# Altium PCB FR3068E-C_DEV1.4.PcbDoc (part 1 of 2)
Units mm, origin at the board's own origin, x right, y up, seen from the top; angles counter-clockwise.
Board outline 100 x 100 mm, 2 copper layers (Top Layer, Bottom Layer); 190 components, 181 nets, 704 pads, 626 vias.
Unrouted connection lines stored in the file: 147.
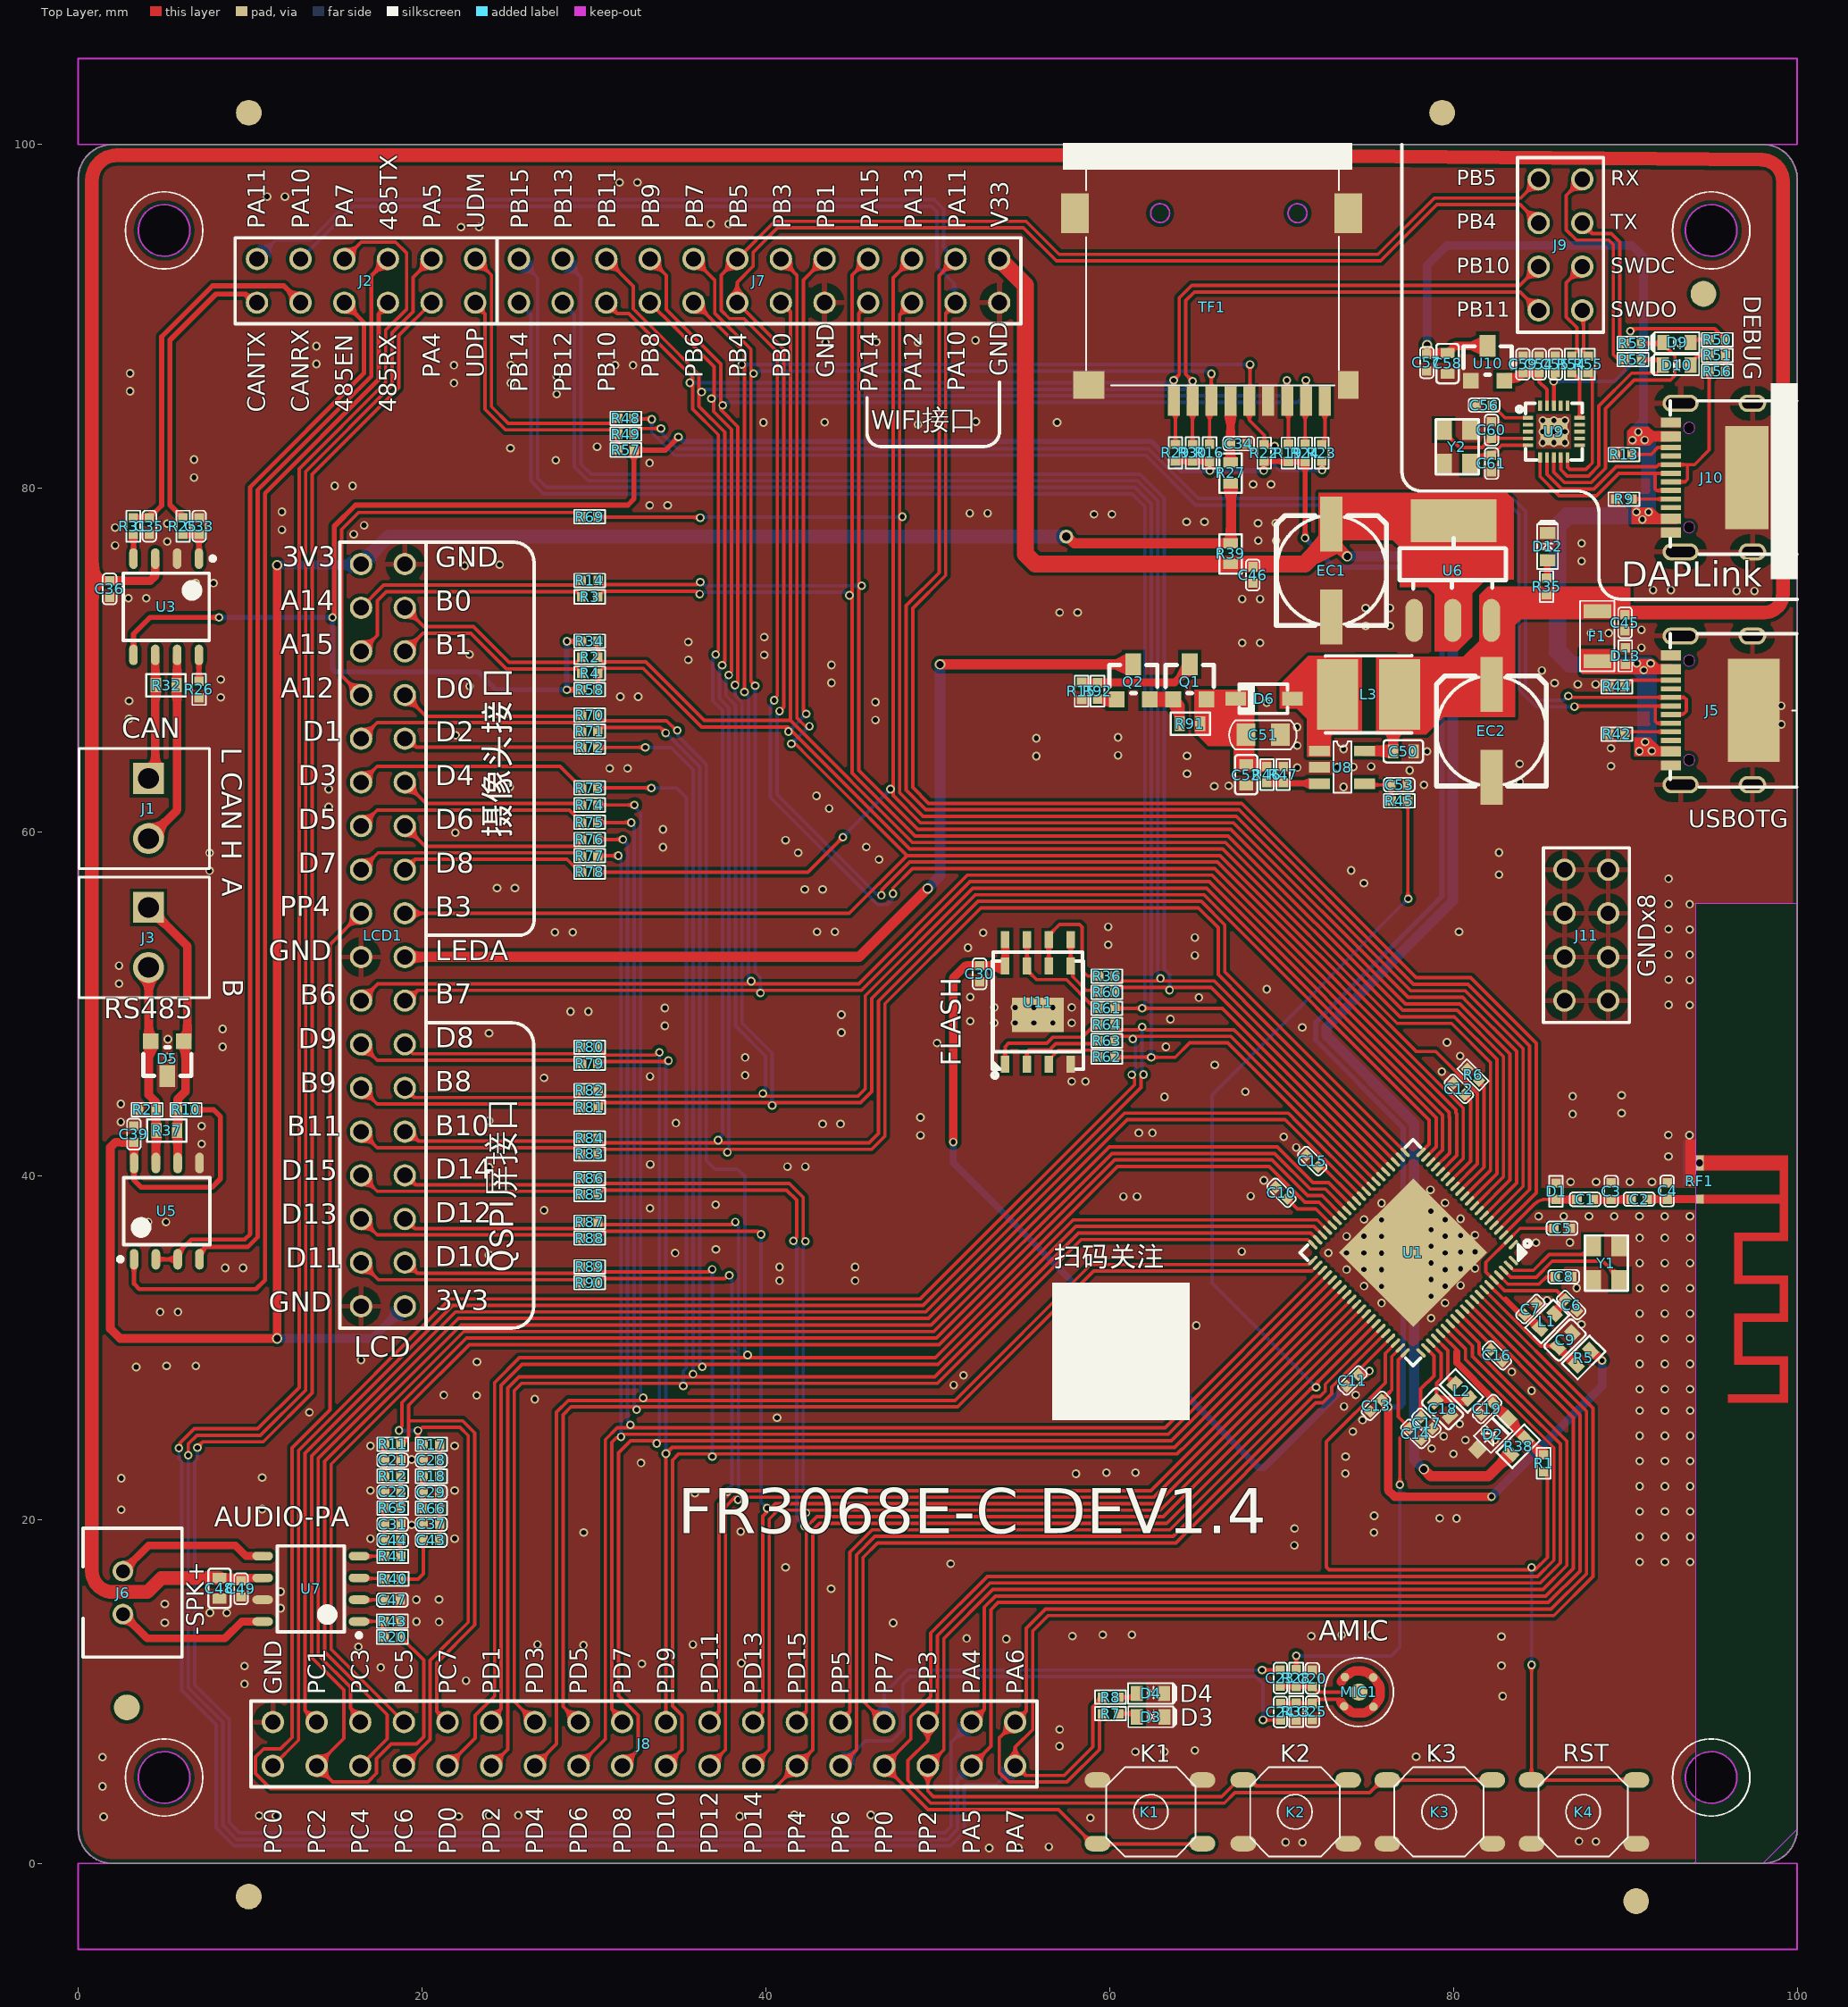
[diagram p0: Top Layer view]
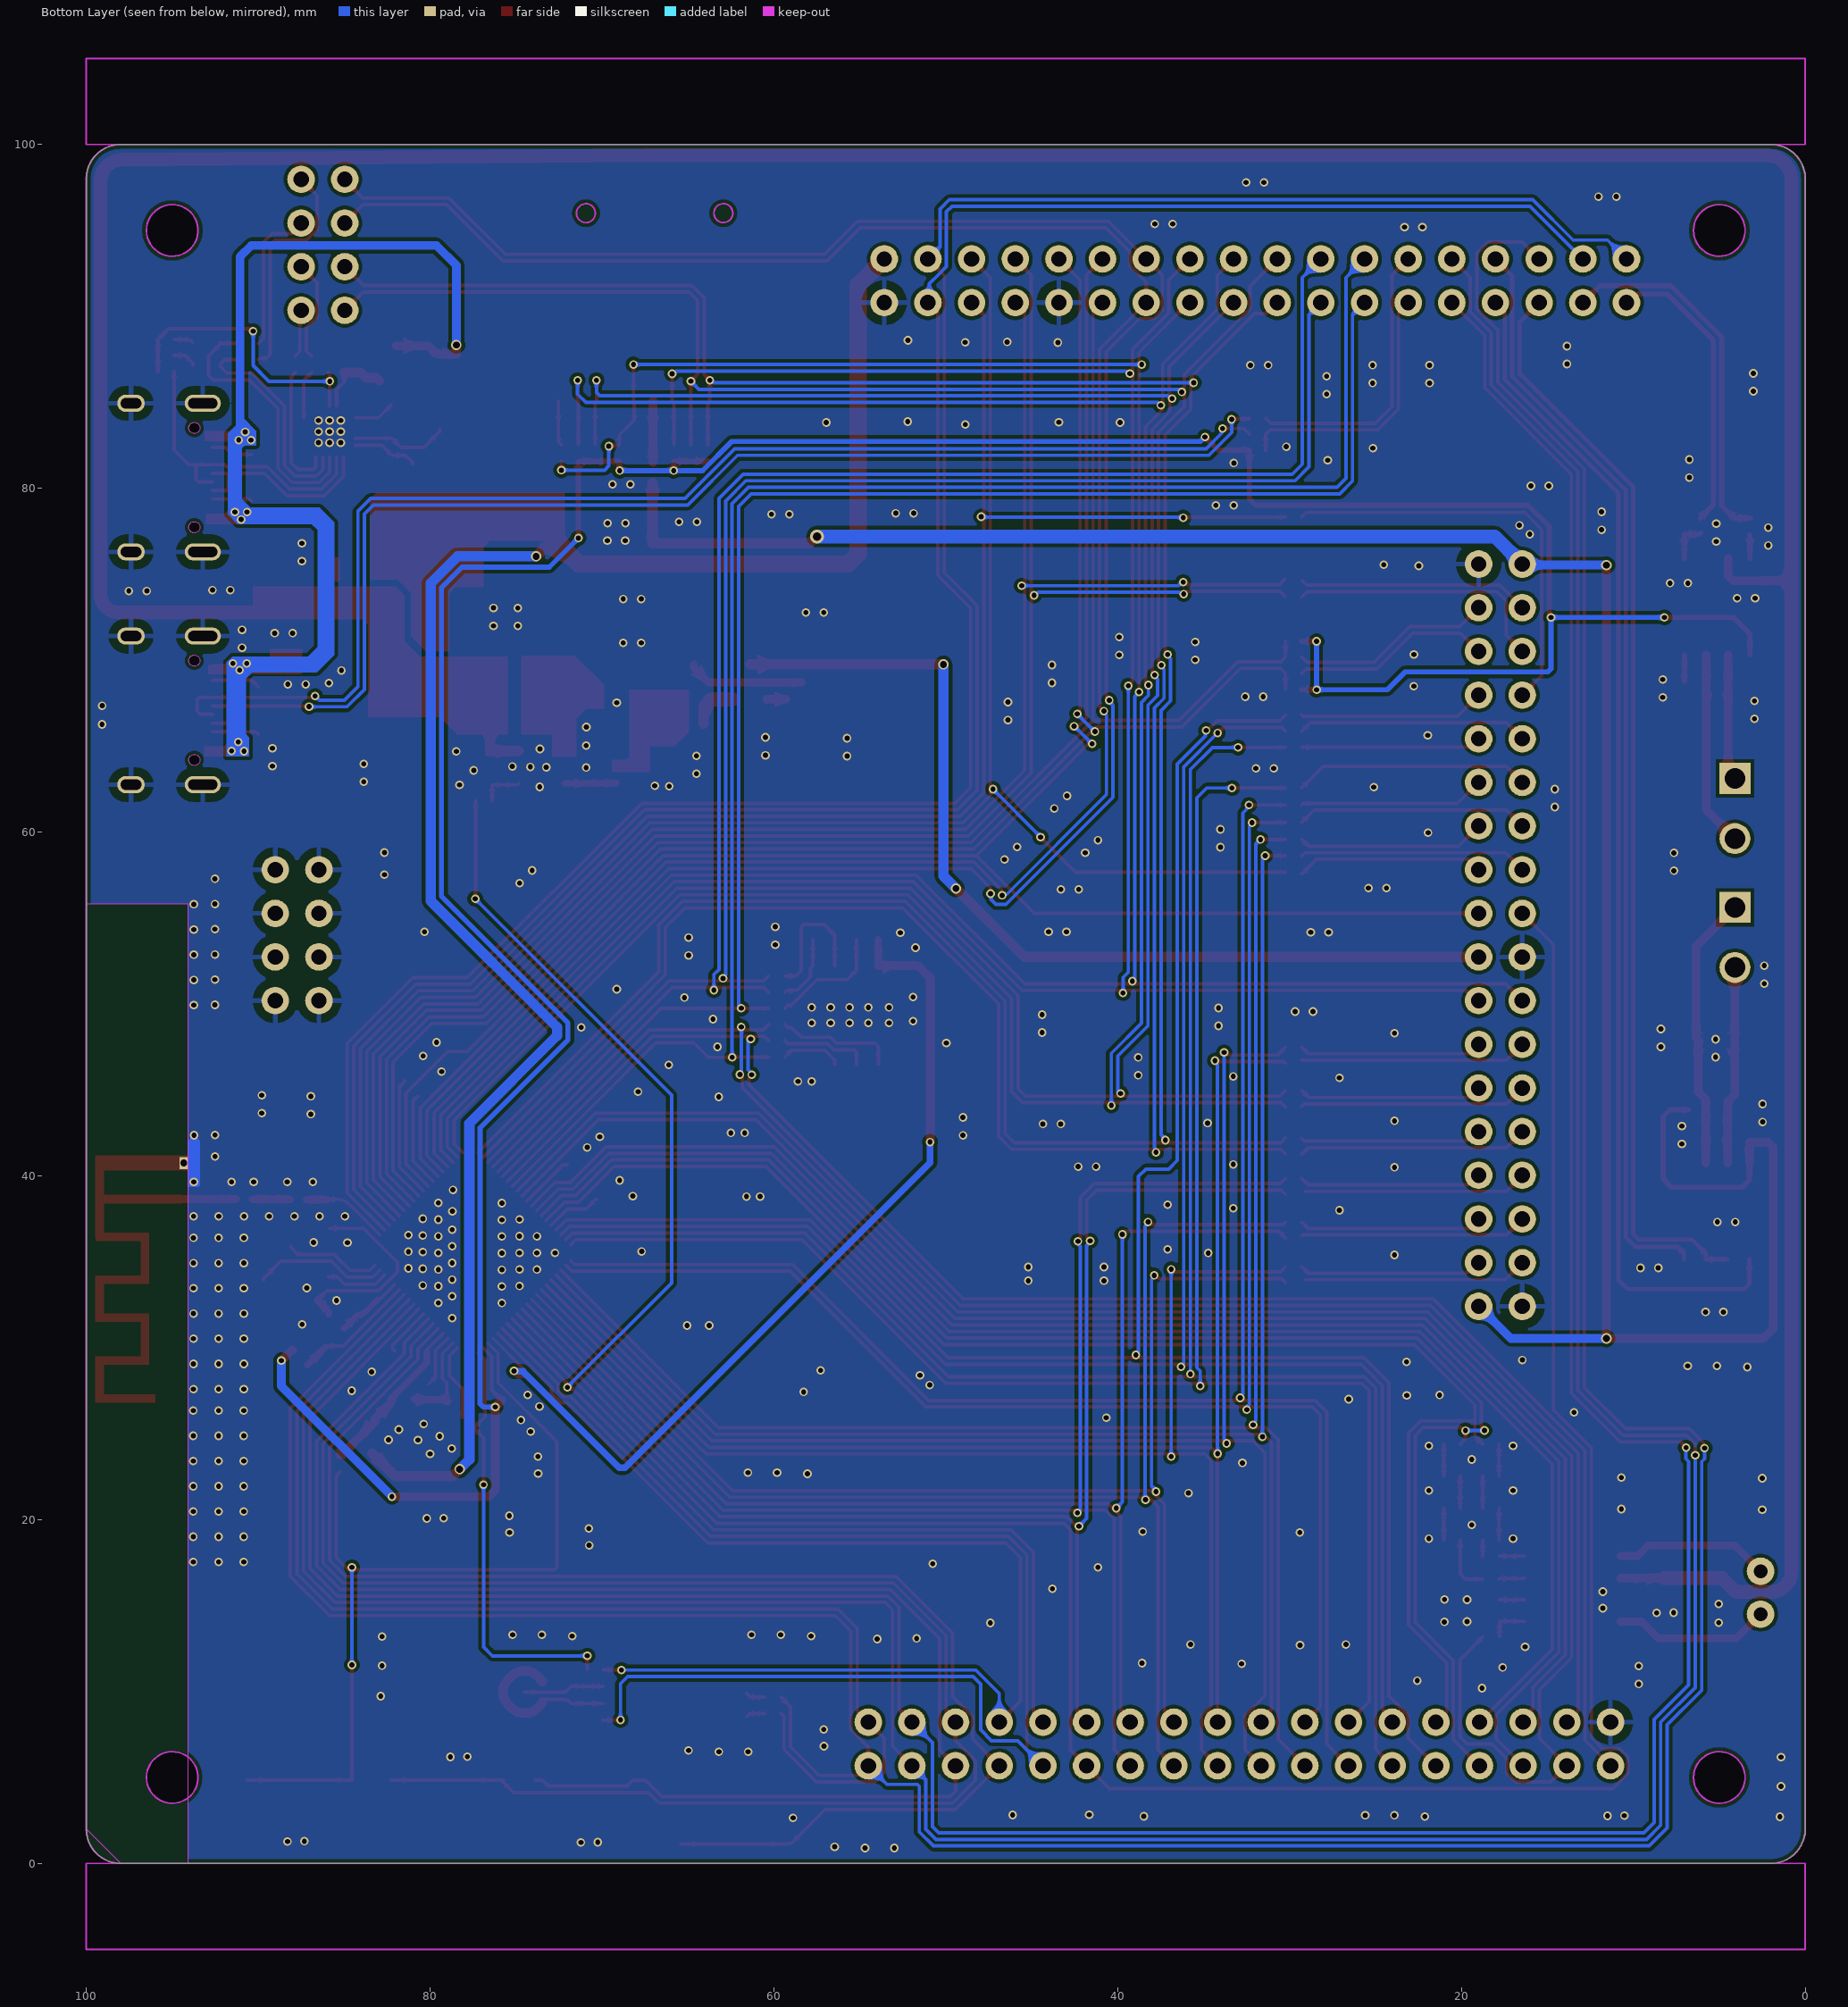
[diagram p1: Bottom Layer view, seen from below]

## Layer stack, top to bottom
Top Solder: solder mask 0.0102, Solder Resist, Dk 3.5
Top Layer: signal copper 0.0356
Dielectric 1: dielectric 0.32, FR-4, Dk 4.8
Bottom Layer: signal copper 0.0356
Bottom Solder: solder mask 0.0102, Solder Resist, Dk 3.5

## Board outline
0,2.003 0,98.003 cw(c2,98.003) 2,100.003 98,100.003 cw(c98,98.003) 100,98.003 100,2.003 cw(c98,2.003) 98,0.003 2,0.003 cw(c2,2.003)
cut-out: 5,3.503 cw(c5,5.003) 3.5,5.003 cw(c5,5.003) 5,6.503 cw(c5,5.003) 6.5,5.003 cw(c5,5.003)
cut-out: 95,93.503 cw(c95,95.003) 93.5,95.003 cw(c95,95.003) 95,96.503 cw(c95,95.003) 96.5,95.003 cw(c95,95.003)
cut-out: 5,93.503 cw(c5,95.003) 3.5,95.003 cw(c5,95.003) 5,96.503 cw(c5,95.003) 6.5,95.003 cw(c5,95.003)
cut-out: 93.5,5.003 ccw(c95,5.003) 95,3.503 ccw(c95,5.003) 96.5,5.003 ccw(c95,5.003) 95,6.503 ccw(c95,5.003)

## Design rules (kind name [scope] priority, off if disabled: settings)
Clearance [All] p1: gap=0.2 ignorepadtopadclearanceinfootprint=FALSE except(0.18: Arc-Arc Arc-Track Arc-SMDPad Arc-THPad Arc-Via Arc-Text Arc-Hole Track-Track Track-SMDPad Track-THPad Track-Via Track-Text Track-Hole SMDPad-SMDPad SMDPad-THPad SMDPad-Via SMDPad-Text SMDPad-Hole THPad-THPad THPad-Via THPad-Text THPad-Hole Via-Via Via-Text Via-Hole Text-Text Text-Hole)
ComponentClearance [All] p1 off: gap=0.254 collisioncheckmode=3 verticalgap=0.254 showdistances=FALSE
HoleToHoleClearance [All] p1 off: gap=0.254 allowstackedmicrovias=TRUE
MinimumSolderMaskSliver [All] p1 off: minsoldermaskwidth=0.254
PolygonConnect [All] p1: thpad.connectstyle=Relief thpad.reliefconductorwidth=0.3 thpad.reliefentries=4 thpad.polygonreliefangle="90 Angle" thpad.airgapwidth=0.5 smdpad.connectstyle=Direct smdpad.reliefconductorwidth=0.254 smdpad.reliefentries=4 smdpad.polygonreliefangle="90 Angle" smdpad.airgapwidth=0.254 via.connectstyle=Direct via.reliefconductorwidth=0.254 via.reliefentries=4 via.polygonreliefangle="90 Angle" via.airgapwidth=0.254
RoutingVias [All] p1: holewidth=0.3 width=0.5 viastyle="Through Hole" minholewidth=0.2 minwidth=0.4 maxholewidth=0.711 maxwidth=1.27
SilkToSilkClearance [All] p1 off: silktosilkclearance=0.254
SilkToSolderMaskClearance [IsPad] p1 off: minsilkscreentomaskgap=0.254 clearancetoexposedcopper=TRUE
SolderMaskExpansion [All] p1: expansion=0.102 istentingtop=FALSE
SupplyNets "Schematic Supply Nets_9" [InNet('VLED')] p1: voltage=0.000
SupplyNets "Schematic Supply Nets_8" [InNet('IO3V3_LDO')] p2: voltage=0.000
SupplyNets "Schematic Supply Nets_7" [InNet('IO1V8_LDO')] p3: voltage=0.000
SupplyNets "Schematic Supply Nets_6" [InNet('VDD33')] p4: voltage=0.000
SupplyNets "Schematic Supply Nets_5" [InNet('+5VI')] p5: voltage=0.000
SupplyNets "Schematic Supply Nets_3" [InNet('MCU_VCC')] p6: voltage=0.000
SupplyNets "Schematic Supply Nets_2" [InNet('VIN')] p7: voltage=0.000
SupplyNets "Schematic Supply Nets_1" [InNet('GND')] p8: voltage=0.000
SupplyNets "Schematic Supply Nets" [InNet('MIC_BIAS')] p9: voltage=0.000
Width [All] p1: maxlimit=2 minlimit=0.15 preferedwidth=0.2
25 further rules are at their usual default settings.

## Classes and differential pairs
component class FR3068E-C_MCU_DEV1.4: C1 C2 C3 C4 C5 C6 C7 C8 C9 C10 C11 C12 C13 C14 C15 C16 C17 C18 C19 C20 C21 C22 C23 C24 C25 C28 C29 C30 C31 C37 D1 D2 D3 D4 K1 K2 K3 K4 L1 L2 MIC1 R1 R5 R6 R7 R8 R11 R12 R17 R18 R28 R33 R36 R60 R61 R62 R63 R64 R65 R66 RF1 U1 U11 Y1
component class FR3068E-C_Device_DEV1.4: C33 C34 C35 C36 C39 C43 C44 C45 C46 C47 C48 C49 C50 C51 C52 C53 D5 D6 D12 D13 EC1 EC2 F1 J1 J2 J3 J5 J6 J7 J8 J11 L3 LCD1 Q1 Q2 R2 R3 R4 R10 R14 R15 R16 R19 R20 R21 R22 R23 R24 R25 R26 R27 R29 R30 R31 R32 R34 R35 R37 R38 R39 R40 R41 R42 R43 R44 R45 R46 R47 R48 R49 R57 R58 R69 R70 R71 R72 R73 R74 R75 R76 R77 R78 R79 R80 R81 R82 R83 R84 R85 R86 R87 R88 R89 R90 R91 R92 TF1 U3 U5 U6 U7 U8
component class FR3068E-C_Debug_DEV1.4: C54 C55 C56 C57 C58 C59 C60 C61 D9 D10 J9 J10 R9 R13 R50 R51 R52 R53 R54 R55 R56 U9 U10 Y2

## Components (designator, comment, footprint, x,y, rotation, side; value= is the part's Value field where it differs from the comment)
C1 "2pF" C0402 87.665,38.632 r180 top
C2 "1.8pF" C0402 90.81,38.642 r180 top
C3 "0.9pF" C0402 89.185,39.112 r270 top
C4 "NC" C0402 92.445,39.122 r270 top
C5 "103" C0402 86.328,36.95 r180 top
C6 "225" C0402 86.855,32.482 r135 top
C7 "33pF" C0402 84.485,32.252 r225 top
C8 "225" C0402 86.413,34.13 r180 top
C9 "106" C0603 86.505,30.462 r225 top
C10 "105" C0402 70.008,39.02 r315 top
C11 "225" C0402 74.128,28.1 r45 top
C12 "105" C0402 80.329,45.062 r315 top
C13 "225" C0402 75.498,26.63 r45 top
C14 "105" C0402 77.788,24.99 r135 top
C15 "105" C0402 71.798,40.87 r315 top
C16 "105" C0402 82.528,29.56 r135 top
C17 "225" C0402 78.438,25.63 r135 top
C18 "106" C0603 79.378,26.45 r135 top
C19 "225" C0402 81.964,26.446 r45 top
C20 "NC" C0402 71.801,10.768 r270 top
C21 "332" C0402 18.295,23.457 r180 top
C22 "101" C0402 18.295,21.607 r0 top
C23 "105" C0402 69.935,10.788 r90 top
C24 "105" C0402 69.943,8.817 r270 top
C25 "NC" C0402 71.801,8.842 r90 top
C28 "332" C0402 20.548,23.459 r0 top
C29 "101" C0402 20.548,21.591 r180 top
C30 "105" C0402 52.432,51.755 r90 top
C31 "NC" C0402 18.295,19.733 r180 top
C33 "NC" C0402 7.04,77.799 r270 top
C34 "225" C0402 67.515,82.599 r180 top
C35 "NC" C0402 4.135,77.799 r90 top
C36 "104/16V" C0402 1.826,74.145 r90 top
C37 "NC" C0402 20.548,19.739 r0 top
C39 "104/16V" C0402 3.243,42.429 r270 top
C43 "104" C0402 20.548,18.8 r180 top
C44 "104" C0402 18.295,18.808 r0 top
C45 "104/16V" C0402 89.984,72.18 r90 top
C46 "104/16V" C0402 68.33,74.96 r90 top
C47 "105" C0402 18.275,15.328 r0 top
C48 "226" C0603 8.22,15.998 r90 top
C49 "104" C0402 9.48,15.978 r270 top
C50 "106" C0603 77.1,64.7 r180 top
C51 "226/25V" C0805 68.93,65.66 r180 top
C52 "104/50V" C0603 67.95,63.33 r90 top
C53 "104/16V" C0402 76.854,62.746 r180 top
C54 "225" C0402 84.99,87.215 r90 top
C55 "225" C0402 85.937,87.215 r90 top
C56 "225" C0402 81.791,84.839 r180 top
C57 "104" C0402 78.452,87.311 r90 top
C58 "106" C0603 79.66,87.271 r270 top
C59 "104" C0402 84.05,87.215 r270 top
C60 "10pF" C0402 82.224,83.391 r270 top
C61 "10pF" C0402 82.224,81.441 r90 top
D1 "NC" R0402#1 85.975,39.102 r270 top
D2 "NC" SOD-323A 82.328,25.01 r45 top
D3 "Red" D0603 61.592,8.525 r0 top
D4 "Red" D0603 61.582,9.89 r0 top
D5 "CDSOT23-SM712" SOT23 5.181,46.947 r180 top
D6 "1N5819W" SOD-123 68.95,67.75 r0 top
D9 "Red" D0603 93.81,88.483 r180 top
D10 "Red" D0603 93.793,87.174 r180 top
D12 "Red" D0603 85.483,75.808 r90 top
D13 "PESD5V" R0402#1 89.999,70.244 r90 top
EC1 "100uF/10V" EC(SMD)6.3_7.7 72.906,75.216 r270 top
EC2 "100uF/10V" EC(SMD)6.3_7.7 82.215,65.887 r270 top
F1 "0R" R1206 88.38,71.4 r270 top
J1 "2.54mm-2P" SIP2P_3.5MM 4.09,61.372 r270 top
J2 "2.54mm_6Px2" 2.54mm-6Pinx2 10.4,93.34 r0 top locked
J3 "2.54mm-2P" SIP2P_3.5MM 4.09,53.872 r270 top
J5 "TYPE-C-16PIN" TYPE_C_L7.35_DIP#1 95.773,67.084 r90 top locked
J6 "2.54mm-2P" 2.54MM_2PIN 0.29,15.753 r270 top
J7 "DIP2.54mm-12PX2" DIP2.54mm-12PX2 53.58,90.8 r180 top locked
J8 "DIP2.54mm-18PX2" "2.54MM-18PIN *2" 54.51,5.683 r180 top locked
J9 "2.54mm_4Px2" 2.54mm-4Pinx2 87.504,97.973 r270 top locked
J10 "TYPE-C-16PIN" TYPE_C_L7.35_DIP#2 95.773,80.624 r90 top locked
J11 "2.54mm_4Px2" 2.54mm-4Pinx2 89.01,57.813 r270 top locked
K1 "L5.2xW5.2xH1.5" "TS-030 5.2*5.2mm" 62.4,3.003 r0 top
K2 "L5.2xW5.2xH1.5" "TS-030 5.2*5.2mm" 70.783,3.003 r180 top
K3 "L5.2xW5.2xH1.5" "TS-030 5.2*5.2mm" 79.166,3.003 r180 top
K4 "L5.2xW5.2xH1.5" "TS-030 5.2*5.2mm" 87.55,3.003 r180 top
L1 "10uH/100mA" L0603 85.465,31.542 r225 top
L2 "2.2uH/350mA" L0603 80.488,27.48 r135 top
L3 "4.7uH/1.5A" CD0403 75.07,68.01 r180 top
LCD1 "DIP2.54mm-18PX2" "2.54MM-18PIN *2" 19,75.593 r270 top locked
MIC1 "MIC" MIC4013SMT 74.515,9.971 r90 top
Q1 "S8550" SOT23 64.673,68.602 r0 top
Q2 "S8550" SOT23 61.39,68.602 r0 top
R1 "1K" R0402#2 85.25,23.28 r270 top
R2 "33R" R0402#1 29.76,70.182 r0 top
R3 "33R" R0402#1 29.76,73.682 r180 top
R4 "33R" R0402#1 29.76,69.237 r0 top
R5 "2.2R" R0603 87.565,29.422 r45 top
R6 "1M" R0402#1 81.149,45.879 r315 top
R7 "1K" R0402#1 60.059,8.716 r180 top
R8 "1K" R0402#1 60.059,9.673 r180 top
R9 "5.1K" R0402#1 89.92,79.37 r0 top
R10 "10K" R0402#2 6.282,43.845 r180 top
R11 "2.2K" R0402#1 18.295,24.389 r0 top
R12 "2.2K" R0402#1 18.295,22.532 r180 top
R13 "5.1K" R0402#1 89.92,81.97 r0 top
R14 "33R" R0402#2 29.76,74.635 r180 top
R15 "100K" R0402#2 58.374,68.209 r90 top
R16 "10K" R0402#2 65.823,82.063 r270 top
R17 "2.2K" R0402#1 20.548,24.381 r180 top
R18 "2.2K" R0402#1 20.548,22.529 r0 top
R19 "10K" R0402#2 70.405,82.059 r270 top
R20 "2.2K" R0402#1 18.285,13.174 r180 top
R21 "10K" R0402#2 4.022,43.845 r0 top
R22 "10K" R0402#1 69,82.059 r270 top
R23 "1K" R0402#1 72.349,82.059 r270 top
R24 "10K" R0402#2 71.377,82.059 r270 top
R25 "0R" R0402#1 6.096,77.799 r90 top
R26 "10K" R0402#1 7.028,68.297 r90 top
R27 "2.2R" R0603 67.05,80.895 r270 top
R28 "2.2K" R0402#2 70.858,10.783 r90 top
R29 "10K" R0402#1 63.834,82.063 r270 top
R30 "10K" R0402#1 64.828,82.063 r270 top
R31 "0R" R0402#1 3.204,77.799 r90 top
R32 "120R" R0603 5.119,68.55 r180 top
R33 "2.2K" R0402#2 70.858,8.836 r90 top
R34 "4.7K" R0402#1 29.762,71.103 r180 top
R35 "2.2K" R0402#1 85.424,74.29 r270 top
R36 "22R" R0402#1 59.838,51.625 r0 top
R37 "120R" R0603 5.16,42.635 r180 top
R38 "0R" R0603 83.788,24.28 r225 top
R39 "0R" R0603 67.049,76.199 r270 top
R40 "10K" R0402#1 18.325,16.548 r180 top
R41 "10K" R0402#1 18.295,17.868 r180 top
R42 "5.1K" R0402#1 89.514,65.695 r0 top
R43 "10K" R0402#1 18.285,14.088 r180 top
R44 "5.1K" R0402#1 89.514,68.452 r0 top
R45 "10K" R0402#1 76.866,61.82 r0 top
R46 "180K" R0402#1 69.15,63.34 r90 top
R47 "10K" R0402#1 70.1,63.34 r270 top
R48 "22R" R0402#1 31.861,84.072 r0 top
R49 "22R" R0402#1 31.861,83.152 r0 top
R50 "1K" R0402#1 95.362,88.646 r0 top
R51 "1K" R0402#1 95.362,87.731 r0 top
R52 "100R" R0402#1 90.46,87.492 r0 top
R53 "100R" R0402#1 90.458,88.429 r0 top
R54 "100R" R0402#1 86.893,87.215 r270 top
R55 "100R" R0402#1 87.841,87.215 r270 top
R56 "1.5K" R0402#1 95.362,86.807 r180 top
R57 "1.5K" R0402#1 31.861,82.224 r180 top
R58 "4.7K" R0402#1 29.764,68.283 r180 top
R60 "22R" R0402#1 59.838,50.685 r0 top
R61 "22R" R0402#1 59.838,49.745 r0 top
R62 "22R" R0402#1 59.838,46.925 r0 top
R63 "22R" R0402#1 59.838,47.865 r0 top
R64 "22R" R0402#1 59.838,48.805 r0 top
R65 "0R" R0402#1 18.295,20.674 r0 top
R66 "0R" R0402#1 20.548,20.661 r180 top
R69 "33R" R0402#1 29.76,78.346 r180 top
R70 "33R" R0402#1 29.76,66.81 r0 top
R71 "33R" R0402#1 29.76,65.867 r180 top
R72 "33R" R0402#1 29.76,64.941 r0 top
R73 "33R" R0402#1 29.76,62.575 r180 top
R74 "33R" R0402#1 29.76,61.579 r0 top
R75 "33R" R0402#1 29.76,60.568 r180 top
R76 "33R" R0402#1 29.76,59.572 r0 top
R77 "33R" R0402#1 29.76,58.62 r180 top
R78 "33R" R0402#1 29.76,57.67 r0 top
R79 "33R" R0402#1 29.763,46.543 r180 top
R80 "33R" R0402#1 29.763,47.483 r0 top
R81 "33R" R0402#1 29.763,44 r180 top
R82 "33R" R0402#1 29.763,44.965 r0 top
R83 "33R" R0402#1 29.76,41.274 r180 top
R84 "33R" R0402#1 29.76,42.202 r0 top
R85 "33R" R0402#1 29.76,38.92 r180 top
R86 "33R" R0402#1 29.76,39.85 r0 top
R87 "33R" R0402#1 29.76,37.31 r0 top
R88 "33R" R0402#1 29.76,36.384 r180 top
R89 "33R" R0402#1 29.76,34.71 r0 top
R90 "33R" R0402#1 29.76,33.782 r180 top
R91 "10R" R0603 64.684,66.301 r0 top
R92 "2.2K" R0402#1 59.301,68.209 r270 top
RF1 "ANT" RFA 94.325,38.652 r270 top
TF1 "TF" TF 65.991,96.007 r180 top locked
U1 "FR3068E-C" QFN80_0909_P0.4 77.659,35.539 r225 top
U3 "TJA1044GT/3Z" SOP8 5.121,73.109 r270 top
U5 "SP3485EN-L/TR" SOP8 5.154,37.949 r90 top
U6 "LM1117-3.3V" TO-223 77.717,72.316 r0 top
U7 "HT6872" SOP8 13.535,15.978 r180 top
U8 "MT3540-F25" SOT23-5 73.53,63.77 r270 top
U9 "FR8003A_QFN20" QFN20_3x3_P0.4 85.846,83.3 r0 top
U10 "662K" SOT23 82,87.135 r0 top
U11 "XT25Q128" WSON8_6X5MM 55.831,49.354 r90 top
Y1 "24MHz/12pF/10ppm" CRY3225_4P 88.898,34.93 r90 top
Y2 "24MHz/12pF/10ppm" CRY3225_4P 80.224,82.416 r270 top

## Footprints (in the part's own frame and the unit in brackets; to place one, negate y for a bottom-side part, rotate by r counter-clockwise, add the part's x,y. Pads: shape width x height; smd on the part's side, far side on the other; paste and mask are expansions set on the pad)
2.54mm-4Pinx2 [mm]
  round 1.3 / inner round 1.6 / far side round 1.6 hole 0.9: 1(0,0) 2(0,-2.54) 3(2.54,0) 4(2.54,-2.54) 5(5.08,0) 6(5.08,-2.54) 7(7.62,0) 8(7.62,-2.54)
  silkscreen extent -1.27,-3.77 8.89,1.23
2.54mm-6Pinx2 [mm]
  round 1.3 / inner round 1.6 / far side round 1.6 hole 0.9: 1(0,0) 2(0,-2.54) 3(2.54,0) 4(2.54,-2.54) 5(5.08,0) 6(5.08,-2.54) 7(7.62,0) 8(7.62,-2.54) 9(10.16,0) 10(10.16,-2.54) 11(12.7,0) 12(12.7,-2.54)
  silkscreen extent -1.27,-3.77 13.97,1.23
"2.54MM-18PIN *2" [mm]
  round 1.3 / inner round 1.6 / far side round 1.6 hole 0.9: 1(0,0) 2(0,-2.54) 3(2.54,0) 4(2.54,-2.54) 5(5.08,0) 6(5.08,-2.54) 7(7.62,0) 8(7.62,-2.54) 9(10.16,0) 10(10.16,-2.54) 11(12.7,0) 12(12.7,-2.54) 13(15.24,0) 14(15.24,-2.54) 15(17.78,0) 16(17.78,-2.54) 17(20.32,0) 18(20.32,-2.54) 19(22.86,0) 20(22.86,-2.54) 21(25.4,0) 22(25.4,-2.54) 23(27.94,0) 24(27.94,-2.54) 25(30.48,0) 26(30.48,-2.54) 27(33.02,0) 28(33.02,-2.54) 29(35.56,0) 30(35.56,-2.54) 31(38.1,0) 32(38.1,-2.54) 33(40.64,0) 34(40.64,-2.54) 35(43.18,0) 36(43.18,-2.54)
  silkscreen extent -1.27,-3.77 44.45,1.23
2.54MM_2PIN [mm]
  round 1.2 / inner round 1.2 / far side round 1.6 hole 0.8: 1(-1.25,2.31) 2(1.25,2.31)
  silkscreen extent -3.75,0 3.75,5.75
C0402 [mm]
  rect 0.55x0.55 smd: 1(-0.475,0) 2(0.475,0)
  silkscreen extent -0.9,-0.4 0.9,0.39, body extent -0.57,-0.27 0.53,0.27, height 0.5
C0603 [mm]
  rect 0.6x0.8 smd: 1(-0.6,0) 2(0.6,0)
  silkscreen extent -1.13,-0.65 1.16,0.65
C0805 [mm]
  rect 1.1x1.3 smd: 1(-1,0) 2(1,0)
  silkscreen extent -1.95,-0.84 1.97,0.84, body extent -1.02,-0.65 1.02,0.65, height 1.1
CD0403 [mm] "Precision Wire Wound Inductor, 2-Leads, Body 5.00x4.50mm, IPC Medium Density"
  rect 2.4x4.1 smd: 1(-1.8,0) 2(1.8,0)
  silkscreen extent -2.51,-2.25 2.52,2.24, body extent -2.6,-2.25 2.6,2.25, height 3.3
CRY3225_4P [mm]
  rect 1.2x1 smd: 1(-1,-0.8) 2(1,-0.8) 3(1,0.8) 4(-1,0.8)
  silkscreen extent -1.6,-1.25 1.6,1.25
D0603 [mm]
  rect 0.7x0.9 smd: 1(0,0) 2(1.6,0)
  silkscreen extent -0.5,-0.6 2.3,0.6, body extent -0.21,-0.41 1.79,0.44, height 0.9
DIP2.54mm-12PX2 [mm]
  round 1.3 / inner round 1.6 / far side round 1.6 hole 0.9: 1(0,0) 2(0,-2.54) 3(2.54,0) 4(2.54,-2.54) 5(5.08,0) 6(5.08,-2.54) 7(7.62,0) 8(7.62,-2.54) 9(10.16,0) 10(10.16,-2.54) 11(12.7,0) 12(12.7,-2.54) 13(15.24,0) 14(15.24,-2.54) 15(17.78,0) 16(17.78,-2.54) 17(20.32,0) 18(20.32,-2.54) 19(22.86,0) 20(22.86,-2.54) 21(25.4,0) 22(25.4,-2.54) 23(27.94,0) 24(27.94,-2.54)
  silkscreen extent -1.27,-3.77 29.21,1.23
EC(SMD)6.3_7.7 [mm]
  rect 3.2x1.3 smd: 1(-2.7,0) 2(2.7,0)
  silkscreen extent -3.2,-3.21 3.2,3.21, body extent -3.73,-3.22 3.77,3.22, height 7
L0603 [mm]
  rect 0.6x0.8 smd: 1(-0.6,0) 2(0.6,0)
  silkscreen extent -1.13,-0.65 1.16,0.65
MIC4013SMT [mm]
  round 1 smd: 1(0,0)
  round 0.5 smd: 2(-0.857,-0.837) 2(-0.83,0.87) 2(0.853,-0.827) 2(0.873,0.823)
  Top Layer pour cut-out: 0,-0.9 -0.344,-0.831 -0.636,-0.636 -0.831,-0.344 -0.9,0 -0.9,0 -0.779,0.45 -0.45,0.779 0,0.9 0,0.9 0.344,0.831 0.636,0.636 0.831,0.344 0.9,0 0.9,0 0.831,-0.344 0.636,-0.636 0.344,-0.831 0,-0.9
  Top Layer lines w0.55: -0.575,1.053 ccw(c0,0) -1.039,0.6 ; 0.604,1.037 cw(c0,0) 1.053,0.575 ; -1.05,-0.58 ccw(c0,0) -0.576,-1.053 ; 1.032,-0.619 cw(c0.01,0.01) 0.972,-0.707 cw(c0.01,0.01) 0.573,-1.05
  silkscreen extent -2,-2 2,2
QFN20_3x3_P0.4 [mm]
  rect 0.6x0.22 smd: 1(-1.5,0.8) 2(-1.5,0.4) 3(-1.5,0) 4(-1.5,-0.4) 5(-1.5,-0.8) 11(1.5,-0.8) 12(1.5,-0.4) 13(1.5,0) 14(1.5,0.4) 15(1.5,0.8)
  rect 0.22x0.6 smd: 6(-0.8,-1.5) 7(-0.4,-1.5) 8(0,-1.5) 9(0.4,-1.5) 10(0.8,-1.5) 16(0.8,1.5) 17(0.4,1.5) 18(0,1.5) 19(-0.4,1.5) 20(-0.8,1.5)
  rect 1.6x1.6 smd: 21(0,0)
  silkscreen extent -2.15,-1.65 1.65,1.65, body extent -1.51,-1.51 1.51,1.51, height 0.8
QFN80_0909_P0.4 [mm]
  oval 0.7x0.2 smd: 1(-4.45,3.8) 2(-4.45,3.4) 3(-4.45,3) 4(-4.45,2.6) 5(-4.45,2.2) 6(-4.45,1.8) 7(-4.45,1.4) 8(-4.45,1) 9(-4.45,0.6) 10(-4.45,0.2) 11(-4.45,-0.2) 12(-4.45,-0.6) 13(-4.45,-1) 14(-4.45,-1.4) 15(-4.45,-1.8) 16(-4.45,-2.2) 17(-4.45,-2.6) 18(-4.45,-3) 19(-4.45,-3.4) 20(-4.45,-3.8) 41(4.45,-3.8) 42(4.45,-3.4) 43(4.45,-3) 44(4.45,-2.6) 45(4.45,-2.2) 46(4.45,-1.8) 47(4.45,-1.4) 48(4.45,-1) 49(4.45,-0.6) 50(4.45,-0.2) 51(4.45,0.2) 52(4.45,0.6) 53(4.45,1) 54(4.45,1.4) 55(4.45,1.8) 56(4.45,2.2) 57(4.45,2.6) 58(4.45,3) 59(4.45,3.4) 60(4.45,3.8)
  oval 0.2x0.7 smd: 21(-3.8,-4.45) 22(-3.4,-4.45) 23(-3,-4.45) 24(-2.6,-4.45) 25(-2.2,-4.45) 26(-1.8,-4.45) 27(-1.4,-4.45) 28(-1,-4.45) 29(-0.6,-4.45) 30(-0.2,-4.45) 31(0.2,-4.45) 32(0.6,-4.45) 33(1,-4.45) 34(1.4,-4.45) 35(1.8,-4.45) 36(2.2,-4.45) 37(2.6,-4.45) 38(3,-4.45) 39(3.4,-4.45) 40(3.8,-4.45) 61(3.8,4.45) 62(3.4,4.45) 63(3,4.45) 64(2.6,4.45) 65(2.2,4.45) 66(1.8,4.45) 67(1.4,4.45) 68(1,4.45) 69(0.6,4.45) 70(0.2,4.45) 71(-0.2,4.45) 72(-0.6,4.45) 73(-1,4.45) 74(-1.4,4.45) 75(-1.8,4.45) 76(-2.2,4.45) 77(-2.6,4.45) 78(-3,4.45) 79(-3.4,4.45) 80(-3.8,4.45)
  rect 6.1x6.1 smd: 81(0,0)
  silkscreen extent -5.26,-4.65 4.65,4.65, body extent -4.51,-4.51 4.51,4.51, height 0.8
R0402#1 [mm]
  rect 0.55x0.55 smd: 1(-0.475,0) 2(0.475,0)
  silkscreen extent -0.9,-0.4 0.9,0.39, body extent -0.57,-0.27 0.53,0.27, height 0.5
R0402#2 [mm]
  rect 0.55x0.55 smd: 1(-0.5,0) 2(0.5,0)
  silkscreen extent -0.9,-0.4 0.9,0.4, body extent -0.58,-0.27 0.52,0.27, height 0.3
R0603 [mm]
  rect 0.6x0.85 smd: 1(-0.6,0) 2(0.6,0)
  silkscreen extent -1.13,-0.65 1.16,0.65, body extent -0.8,-0.42 0.8,0.43, height 0.4
R1206 [mm]
  rect 0.8x1.6 smd: 1(-1.45,0) 2(1.45,0)
  silkscreen extent -2.05,-1 2.05,1
RFA [mm]
  rect 0.5x0.5 smd mask+0.003: 1(0,0)
  rect 0.9x0.5 smd mask+0.003: 2(-2.1,0)
  rect 0.7x0.5 hole 0.4 mask+0.01: 2(-2.1,0)
  rect 0.9x0.5 on Top Solder mask+0.003: 2(-2.1,0)
  Top Layer region: 2.45,2.009 2.45,5.149 1.95,5.149 1.95,2.009
  Top Layer region: 7.15,2.01 7.15,5.15 6.65,5.15 6.65,2.01
  Top Layer region: 7.15,4.65 7.15,5.15 4.449,5.15 4.449,4.65
  Top Layer region: 4.95,2.01 4.95,5.15 4.449,5.15 4.449,2.01
  Top Layer region: 4.951,2.01 4.951,2.51 1.951,2.51 1.951,2.01
  Top Layer region: -1.651,-0.249 -1.651,5.151 -2.55,5.151 -2.55,-0.249
  Top Layer region: 0.25,0.092 0.25,4.9 -0.251,4.9 -0.251,0.092
  Top Layer region: 9.65,2.01 9.65,5.15 9.15,5.15 9.15,2.01
  Top Layer region: 6.949,2.51 6.949,2.01 9.65,2.01 9.65,2.51
  Top Layer region: 11.851,4.651 11.851,5.15 9.151,5.15 9.151,4.651
  Top Layer region: 11.85,1.65 11.85,5.15 11.35,5.15 11.35,1.65
  Top Layer lines w0.5: 2.2,4.9 -2.3,4.9
SIP2P_3.5MM [mm]
  rect 1.8x1.8 / inner round 1.8 / far side rect 1.8x1.8 hole 1.2: 1(-1.75,0)
  round 1.8 hole 1.2: 2(1.75,0)
  silkscreen extent -3.5,-4.05 3.5,3.55
SOD-123 [mm]
  rect 1.2x0.8 smd: 1(1.7,0) 2(-1.6,0)
  silkscreen extent -1.4,-0.85 1.4,0.85
SOD-323A [mm]
  rect 0.8x0.8 smd: 1(-1.29,0) 2(1.2,0)
  silkscreen extent -0.9,-0.7 0.9,0.7
SOP8 [mm] "SOIC, 8-Leads, Body 5.00x3.90mm, Pitch 1.27mm, IPC Medium Density"
  oval 1.2x0.5 smd: 1(-2.8,1.905) 2(-2.8,0.635) 3(-2.8,-0.635) 4(-2.8,-1.905) 5(2.8,-1.905) 6(2.8,-0.635) 7(2.8,0.635) 8(2.8,1.905)
  silkscreen extent -2.92,-2.5 1.95,2.83, body extent -3,-2.5 3,2.5, height 1.8
SOT23 [mil]
  rect 36x36 smd: 1(-38.28,-34.67) 2(37.72,-34.67)
  rect 36x50 smd: 3(-0.28,45.33)
  silkscreen extent -55,-21 55,44, body extent -55,-39 55,63, height 39
SOT23-5 [mm]
  rect 0.62x1.22 smd: 1(-0.95,-1.32) 2(0,-1.32) 3(0.95,-1.32) 4(0.95,1.31) 5(-0.95,1.31)
  silkscreen extent -1.5,-0.49 1.47,0.53
TF [mm]
  rect 0.7x1.7 smd: 1(2.261,10.926) 2(1.161,10.926) 3(0.061,10.926) 4(-1.039,10.926) 5(-2.139,10.926) 6(-3.239,10.926) 7(-4.339,10.926) 8(-5.439,10.926) 9(-6.539,10.926)
  rect 1.6x2.3 smd: 10(-7.9,0) 10(8,0)
  rect 1.2x1.6 smd: 10(-7.9,10)
  rect 1.8x1.6 smd: 10(7.2,10)
  Keep-Out Layer circle w0.1: c3.05,0 r0.55
  Keep-Out Layer circle w0.1: c-4.943,0.003 r0.55
  silkscreen extent -7.34,-4 7.35,10.03
TO-223 [mm]
  oval 1x2.5 smd: 1(4.5,0) 2(0,0) 3(2.25,0)
  rect 5x2.5 smd: 3(2.3,5.8)
  silkscreen extent -0.85,1.85 5.35,4.8
"TS-030 5.2*5.2mm" [mm]
  oval 1.5x0.9 smd: 1(-3.1,-1.85) 1(3,-1.85) 2(-3.1,1.85) 2(3,1.85)
  silkscreen extent -2.6,-2.6 2.6,2.6
TYPE_C_L7.35_DIP#1 [mm]
  round 0.65 hole 0.65 unplated paste+0 mask+0.102: 0(-2.89,2.054) 0(2.89,2.054)
  oval 1x1.6 hole 0.6 slot 1.2 at 90 deg: 17(-4.324,-1.627) 20(4.321,-1.627)
  oval 1x2.1 hole 0.6 slot 1.7 at 90 deg: 18(-4.324,2.55) 19(4.321,2.55)
  rect 6x3 smd: 20(0,-1.7)
  rect 0.3x1.16 smd: A1(-3.35,3.12) A4(-2.55,3.12) A5(-1.25,3.12) A6(-0.25,3.12) A7(0.25,3.12) A8(1.25,3.12) A9(2.54,3.12) A12(3.35,3.12) B1(3.06,3.12) B4(2.24,3.12) B5(1.75,3.12) B6(0.75,3.12) B7(-0.75,3.12) B8(-1.75,3.12) B9(-2.25,3.12) B12(-3.06,3.12)
  Keep-Out Layer circle w0.05: c2.89,2.054 r0.325
  Keep-Out Layer circle w0.05: c-2.89,2.054 r0.325
  Keep-Out Layer circle w0.05: c2.89,2.054 r0.325
  Keep-Out Layer circle w0.05: c-2.89,2.054 r0.325
  silkscreen extent -4.47,-4.2 4.47,3.15, body extent -4.47,-4.2 4.46,3.15, height 3.2
TYPE_C_L7.35_DIP#2 [mm]
  round 0.65 hole 0.65 unplated paste+0 mask+0.102: 0(-2.89,2.054) 0(2.89,2.054)
  oval 1x1.6 hole 0.6 slot 1.2 at 90 deg: 17(-4.324,-1.627) 20(4.321,-1.627)
  oval 1x2.1 hole 0.6 slot 1.7 at 90 deg: 18(-4.324,2.55) 19(4.321,2.55)
  rect 6x2.5 smd: 20(0,-1.3)
  rect 0.3x1.16 smd: A1(-3.35,3.12) A4(-2.55,3.12) A5(-1.25,3.12) A6(-0.25,3.12) A7(0.25,3.12) A8(1.25,3.12) A9(2.54,3.12) A12(3.35,3.12) B1(3.06,3.12) B4(2.24,3.12) B5(1.75,3.12) B6(0.75,3.12) B7(-0.75,3.12) B8(-1.75,3.12) B9(-2.25,3.12) B12(-3.06,3.12)
  Keep-Out Layer circle w0.05: c-2.89,2.054 r0.325
  Keep-Out Layer circle w0.05: c2.89,2.054 r0.325
  Keep-Out Layer circle w0.05: c-2.89,2.054 r0.325
  Keep-Out Layer circle w0.05: c2.89,2.054 r0.325
  silkscreen extent -4.47,-4.2 4.47,3.15, body extent -4.47,-4.2 4.46,3.15, height 3.2
WSON8_6X5MM [mm] "SON, 8-Leads, Body 5.00x6.00mm, Pitch 1.27mm, Thermal Pad 3.00x2.00mm, IPC Medium Density"
  rect 1x0.5 smd: 1(-2.86,1.905) 2(-2.86,0.635) 3(-2.86,-0.635) 4(-2.86,-1.905) 5(2.86,-1.905) 5(4.39,-1.905) 6(2.86,-0.635) 6(4.39,-0.635) 7(2.86,0.635) 7(4.39,0.635) 8(2.86,1.905) 8(4.39,1.905)
  rect 2x3 smd paste-1: 4(0,0)
  silkscreen extent -3.64,-2.65 3.66,2.65, body extent -3.1,-2.5 3.1,2.5, height 0.8

## Part data
C1 C2 C3 C4 C5 C6 C7 C8 C9 C10 C11 C12 C13 C14 C15 C16 C17 C18 C19 C20 C21 C22 C23 C24 C25 C28 C29 C30 C31 C33 C34 C35 C36 C37 C39 C43 C44 C45 C46 C47 C48 C49 C50 C51 C52 C53 C54 C55 C56 C60 C61: library part C, PartName=贴片电容
C57 C58 C59: library part C
D1 D2: library part TVS
D3 D4 D9 D10 D12: library part LED
D5: library part TVS-CDSOT23-SM712
D6: library part 1N5819
D13: library part ESD
EC1 EC2: library part ELECTRO, Parameter 1=C280394
F1: library part FUSE
J1 J3: library part 2.54mm_Single_Row_2Pin
J5 J10: "沉板"
J6: library part Speaker
J7: library part 2.54mm-12PX2
J8 LCD1: library part 2.54mm-18PX2
K1 K2 K3 K4: library part SW(TS-030)
L1 L2 L3: library part L
Q1 Q2: library part PNP
R1 R2 R3 R4 R5 R6 R7 R8 R9 R10 R11 R12 R13 R14 R15 R16 R17 R18 R19 R20 R21 R22 R23 R24 R25 R26 R27 R28 R29 R30 R31 R32 R33 R34 R35 R36 R37 R38 R39 R40 R41 R42 R43 R44 R45 R46 R47 R48 R49 R50 R51 R52 R53 R54 R55 R56 R57 R58 R60 R61 R62 R63 R64 R65 R66 R69 R70 R71 R72 R73 R74 R75 R76 R77 R78 R79 R80 R81 R82 R83 R84 R85 R86 R87 R88 R89 R90 R91 R92: library part R
RF1: library part RFANT_BT
U1: library part FR3068E_C, "QFN80_0909_P0.4"
U3: library part SN65HVD230DR
U5: library part SN65HVD11DR
U6: library part LM1117
U8: library part DC/DC_MT3450
U11: library part PSRAM
Y1 Y2: library part CRY3225

## Free pads (board coordinates)
  round 1.5 smd: 9(9.919,-1.926) 10(90.633,-2.193) 11(9.926,101.847) 12(79.35,101.847) Mark7(2.833,9.079) Mark7(94.552,91.31)

## Via types
v1: diameter 0.5, hole 0.3, Top Layer to Bottom Layer, tented both sides, 618 vias
v2: diameter 0.6, hole 0.4, Top Layer to Bottom Layer, tented both sides, 7 vias
v3: diameter 0.8, hole 0.5, Top Layer to Bottom Layer, tented both sides, 1 vias

## Nets (pads, with @x,y where several pads share a name; then routed paths per layer and width w, separated by ;. In a path a pad name is that pad's centre, name@x,y a point inside that pad or via, vN(x,y) a via of type N, cw(c..) or ccw(c..) an arc to the next point about the centre after c; other vN are vias at no path point)
485EN: J2.6 U5.2 U5.3 | length 63.7
  Top Layer w0.25: U5.2@4.519,35.149 U5.3@5.789,35.149 5.789,35.499 6.584,36.294 9.687,36.294 10.007,36.614 10.007,80.07 16.624,86.687 16.624,89.656 J2.6@15.48,90.8
485RX: J2.8 U5.1 | length 69.2
  Top Layer w0.25: U5.1@3.249,35.149 3.249,33.718 3.554,33.413 10.339,33.413 10.867,33.94 10.867,79.714 17.484,86.331 17.484,90.129 18.02,90.665 J2.8@18.02,90.8
485TX: J2.7 U5.4 | length 64.2
  Top Layer w0.25: U5.4@7.059,35.149 7.059,35.508 7.415,35.864 9.865,35.864 10.437,36.436 10.437,79.892 17.054,86.509 17.054,92.374 J2.7@18.02,93.34
+5VI: C36.2 C45.2 C48.2 C49.1 C50.2 EC2.1 F1.1 L3.1 R35.2 U3.3 U6.1 U7.6 U8.5 | length 253.7
  Top Layer w0.2: C50.2@76.5,64.72 C50.2@76.7,64.52
  Top Layer w0.45: 0.747,84.268 0.8,84.268
  Top Layer w0.5: 0.8,74.619 4.193,74.619 4.486,74.912 U3.3@4.486,75.909 ; C48.2@8.22,16.598 8.235,16.613 U7.6@10.735,16.613 ; L3.1@76.87,68.01 81.815,68.01 82.215,68.41 EC2.1@82.215,68.587 ; EC2.1@82.216,68.588 U6.1@82.216,72.315 ; U6.1@82.217,72.316 82.217,72.758 82.448,72.989 89.373,72.989
  Top Layer w0.6: U8.5@74.84,64.72 76.5,64.72 76.5,67.64 L3.1@76.87,68.01
  Top Layer w0.8: C48.2@8.22,16.598 4.831,16.598 4.026,15.793 2.01,15.793 cw(c2.01,17.003) 0.8,17.003 0.8,74.619 0.8,84.268 0.8,97.912 cw(c2.261,97.912) 2.261,99.373 67.47,99.373 97.912,99.115 ccw(c97.919,99.915) 97.919,99.115 cw(c97.919,97.86) 99.173,97.86 99.173,73.854 cw(c98.09,73.854) 98.09,72.771 89.59,72.771 89.373,72.989
A12: LCD1.8 R69.2 | length 24.6
  Top Layer w0.2: LCD1.8@16.46,67.973 15.33,69.103 15.33,77.609 16.313,78.592 29.039,78.592 R69.2@29.285,78.346
A13: LCD1.15 R78.1 | length 10.9
  Top Layer w0.2: LCD1.15@19,57.813 19.602,58.414 28.436,58.414 R78.1@29.285,57.566
A14: LCD1.4 R14.2 | length 13.5
  Top Layer w0.2: LCD1.4@16.46,73.053 17.776,74.369 28.994,74.369 R14.2@29.26,74.635
A15: LCD1.6 R3.2 | length 15.6
  Top Layer w0.2: LCD1.6@16.46,70.513 17.399,71.451 17.399,73.454 17.933,73.989 28.978,73.989 R3.2@29.285,73.682
ANT: C1.2 D1.2 U1.3 | length 5.1
  Top Layer w0.2: U1.3@82.927,36.564 84.719,38.356 cw(c85.385,37.69) 85.385,38.632 D1.2@85.975,38.632
  Top Layer w0.4: D1.2@85.975,38.602 D1.2@85.99,38.617 ; C1.2@87.175,38.617 C1.2@87.19,38.632
  Top Layer w0.45: D1.2@85.99,38.617 C1.2@87.175,38.617
Audio_N: C37.2 C43.1 R66.1 | length 1.9
  Top Layer w0.2: C43.1@21.023,18.8 C37.2@21.023,19.739 R66.1@21.023,20.661
Audio_P: C31.2 C44.1 R65.1 | length 1.9
  Top Layer w0.2: C44.1@17.82,18.808 R65.1@17.82,20.674
B0: LCD1.3 R2.1 | length 11.7
  Top Layer w0.2: LCD1.3@19,73.053 20.102,71.95 22.998,71.95 25.075,69.873 28.977,69.873 R2.1@29.285,70.182
B1: LCD1.5 R4.1 | length 11.7
  Top Layer w0.2: LCD1.5@19,70.513 20.058,71.57 22.84,71.57 24.917,69.493 29.029,69.493 R4.1@29.285,69.237
B8: LCD1.25 R82.1 | length 10.7
  Top Layer w0.2: LCD1.25@19,45.113 19,45.109 19.547,44.563 28.885,44.563 R82.1@29.288,44.965
B9: LCD1.26 R81.2 | length 13.3
  Top Layer w0.2: LCD1.26@16.46,45.113 17.39,44.183 29.147,44.183 R81.2@29.285,44.045
B10: LCD1.27 R84.1 | length 10.6
  Top Layer w0.2: LCD1.27@19,42.573 19.243,42.573 19.793,42.023 29.138,42.023 R84.1@29.285,42.17
B11: LCD1.28 R83.2 | length 13.4
  Top Layer w0.2: LCD1.28@16.46,42.573 17.39,41.643 28.916,41.643 R83.2@29.285,41.274
BT_BFB: C5.2 C6.2 L1.1 U1.2 U1.76 | length 11.7
  Top Layer w0.2: C5.2@85.853,36.95 83.879,36.95 U1.2@83.21,36.281 81.898,34.969 81.898,34.411 U1.76@82.362,33.948 82.989,33.32 86.017,33.32 C6.2@86.519,32.818
  Top Layer w0.4: L1.1@85.889,31.966 85.889,32.082 86.519,32.712 C6.2@86.519,32.818
CAN_RX: C35.2 J2.4 R31.2 | length 21.5
  Top Layer w0.3: R31.2@3.204,78.274 C35.2@4.135,78.274 4.861,79 4.861,88.823 7.818,91.78 11.96,91.78 J2.4@12.94,90.8 ; R31.2@3.204,78.274 R31.2@3.205,78.277
CAN_TX: J2.2 R25.2 | length 17
  Top Layer w0.3: R25.2@6.096,78.274 5.341,79.03 5.341,88.624 8.017,91.3 9.724,91.3 10.224,90.8 J2.2@10.4,90.8
CANH: J1.2 R32.1 U3.7 | length 11.4
  Top Layer w0.5: J1.2@4.09,59.622 5.756,61.288 U3.7@5.756,70.309
CANL: J1.1 R32.2 U3.6 | length 7.4
  Top Layer w0.5: J1.1@4.09,63.122 4.486,63.518 U3.6@4.486,70.309
D0: LCD1.7 R70.1 | length 10.8
  Top Layer w0.2: LCD1.7@19,67.973 20.23,66.743 29.218,66.743 R70.1@29.285,66.81
D1: LCD1.10 R71.2 | length 13.4
  Top Layer w0.2: LCD1.10@16.46,65.433 17.39,66.363 28.787,66.363 28.894,66.255 28.897,66.255 R71.2@29.285,65.867
D2: LCD1.9 R72.1 | length 10.5
  Top Layer w0.2: LCD1.9@19,65.433 19.175,65.433 19.667,64.941 R72.1@29.285,64.941
D3: LCD1.12 R73.2 | length 13.7
  Top Layer w0.2: LCD1.12@16.46,62.893 17.39,63.823 28.037,63.823 R73.2@29.285,62.575
D4: LCD1.11 R74.1 | length 10.8
  Top Layer w0.2: LCD1.11@19,62.893 20.23,61.663 29.202,61.663 R74.1@29.285,61.579
D5: LCD1.14 R75.2 | length 13.5
  Top Layer w0.2: LCD1.14@16.46,60.353 17.39,61.283 28.57,61.283 R75.2@29.285,60.568
D6: LCD1.13 R76.1 | length 10.9
  Top Layer w0.2: LCD1.13@19,60.353 20.178,59.174 28.887,59.174 R76.1@29.285,59.572
D7: LCD1.16 R77.2 | length 13.3
  Top Layer w0.2: LCD1.16@16.46,57.813 17.442,58.794 29.111,58.794 R77.2@29.285,58.62 ; R77.2@29.28,58.615 R77.2@29.285,58.61
D8: LCD1.23 R80.1 | length 10.7
  Top Layer w0.2: LCD1.23@19,47.653 19,47.557 19.455,47.103 28.907,47.103 R80.1@29.288,47.483
D9: LCD1.24 R79.2 | length 13.2
  Top Layer w0.2: LCD1.24@16.46,47.653 17.39,46.723 R79.2@29.283,46.723
D10: LCD1.33 R89.1 | length 10.7
  Top Layer w0.2: LCD1.33@19,34.953 19.122,34.953 19.733,34.342 28.917,34.342 R89.1@29.285,34.71
D11: LCD1.34 R90.2 | length 13
  Top Layer w0.2: LCD1.34@16.46,34.953 17.451,33.962 R90.2@29.083,33.962
D12: LCD1.31 R87.1 | length 10.7
  Top Layer w0.2: LCD1.31@19,37.493 19.027,37.493 19.577,36.943 28.918,36.943 R87.1@29.285,37.31
D13: LCD1.32 R88.2 | length 13.2
  Top Layer w0.2: LCD1.32@16.46,37.493 17.39,36.563 29.226,36.563 R88.2@29.285,36.503
D14: LCD1.29 R86.1 | length 10.7
  Top Layer w0.2: LCD1.29@19,40.033 19.078,40.033 19.628,39.483 28.918,39.483 R86.1@29.285,39.85
D15: LCD1.30 R85.2 | length 13
  Top Layer w0.2: LCD1.30@16.46,40.033 17.39,39.103 R85.2@29.078,39.103
DACN: J8.29 R17.2 U1.34 | length 89.6
  Top Layer w0.2: v1(18.663,25.189) 18.663,25.27 18.839,25.446 18.839,26.814 22.59,30.566 49.938,30.566 60.3,40.928 69.446,40.928 71.523,38.85 71.728,38.85 72.368,38.85 U1.34@73.523,37.695 ; J8.29@18.95,5.683 20.478,7.211 20.478,11.818 22.694,14.034 22.694,24.891 22.217,25.368 20.031,25.368 19.847,25.184 v1(19.766,25.184) 19.766,24.726 19.898,24.594 19.898,24.556 R17.2@20.073,24.381
  Bottom Layer w0.2: v1(18.663,25.189) 18.665,25.187 19.764,25.187 v1(19.766,25.184)
DACP: J8.28 R11.2 U1.35 | length 85.7
  Top Layer w0.2: R11.2@18.77,24.389 19.219,24.839 19.219,25.748 ; J8.28@21.49,8.223 20.858,8.854 20.858,11.66 23.074,13.876 23.074,25.048 22.374,25.748 19.219,25.748 ; U1.35@73.24,37.412 72.182,38.47 71.366,38.47 69.288,40.548 60.457,40.548 50.095,30.186 22.748,30.186 19.219,26.657 19.219,25.748
GND: C3.1 C4.1 C5.1 C6.1 C7.1 C8.1 C9.1 C10.1 C11.1 C12.1 C13.1 C14.1 C15.1 C16.1 C17.1 C18.1 C19.1 C20.1 C21.1 C22.1 C25.1 C28.1 C29.1 C30.1 C31.1 C33.1 C34.1 C35.1 C36.1 C37.1 C39.1 C45.1 C46.1 C47.2 C48.1 C49.2 C50.1 C51.1 C52.1 C53.1 C54.2 C55.2 C56.2 C57.1 C58.2 C59.1 C60.1 C61.1 D1.1 D2.1 D3.2 D4.2 D5.3 D12.2 D13.2 EC1.2 EC2.2 J5.17 J5.18 J5.19 J5.20 J5.A1 J5.A12 J5.B1 J5.B12 J7.1 J7.9 J8.36 J10.17 J10.18 J10.19 J10.20 J10.A1 J10.A12 J10.B1 J10.B12 J11.1 J11.2 J11.3 J11.4 J11.5 J11.6 J11.7 J11.8 K1.2 K2.2 K3.2 K4.2 LCD1.1 LCD1.20 LCD1.36 R6.1 R9.1 R13.1 R15.1 R21.1 R26.1 R33.1 R42.1 R43.1 R44.1 R47.1 RF1.2@94.325,40.752 TF1.6 TF1.10 U1.81 U3.2 U5.5 U6.2 U7.7 U8.2 U9.21 U10.1 U11.4 Y1.2 Y1.4 Y2.2 Y2.4
  other v1: 53,0.9 54.697,0.9 56.465,0.971 71.226,1.222 70.245,1.238 88.294,1.279 87.314,1.295 58.886,2.647 1.481,2.715 22.135,2.729 38.481,2.743 11.505,2.772 10.524,2.787 23.903,2.8 25.6,2.8 46.115,2.823 41.657,2.839 1.41,4.483 1.41,6.18 77.835,6.215 78.816,6.199 61.5,6.5 63.197,6.5 64.965,6.571 57.084,6.819 57.1,7.8 82.871,9.735 18.8,10.2 9.68,10.44 22.567,10.637 17.6,11.4 9.68,11.48 82.8,11.503 32.79,11.62 38.582,11.652 16.3,12.6 29.39,12.7 26.72,12.74 35.76,12.74 53.99,13.06 51.69,13.09 82.8,13.2 57.835,13.229 71.735,13.229 59.603,13.3 61.3,13.3 73.503,13.3 75.2,13.3 5.04,14.01 47.412,13.993 20.994,14.051 19.676,14.071 7.662,14.588 8.642,14.572 11.774,14.849 5.04,15.1 19.672,15.341 20.987,15.358 11.774,15.811 43.801,15.977 41.15,17.23 50.76,17.43 90.841,17.542 92.308,17.542 93.775,17.542 70.747,18.51 17,18.9 21.9,18.9 90.841,19.009 92.308,19.009 93.775,19.009 29.41,19.25 75.378,19.249 38.54,19.31 70.763,19.491 19.4,19.7 80.188,20.072 79.207,20.088 75.394,20.23 90.841,20.476 92.308,20.476 93.775,20.476 2.5,20.58 10.7,20.62 35.88,21.55 17,21.7 21.9,21.7 90.841,21.943 92.308,21.943 93.775,21.943 2.5,22.41 10.7,22.45 58.045,22.669 73.716,22.689 59.813,22.74 61.51,22.74 32.74,23.3 90.841,23.41 92.308,23.41 93.775,23.41 19.4,23.5 73.732,23.67 80.002,23.831 78.74,24.136 17,24.3 21.9,24.3 80.7,24.629 82.418,24.648 79.442,24.855 90.841,24.877 92.308,24.877 93.775,24.877 74.151,25.131 81.822,25.243 80.369,25.563 74.718,25.793 40.66,25.93 13.45,26.24 90.841,26.344 92.308,26.344 93.775,26.344 73.637,26.589 26.56,27.01 23.18,27.23 21.27,27.25 74.322,27.26 58.267,27.43 84.557,27.506 90.834,27.594 92.301,27.594 93.768,27.594 50.934,27.834 51.5,28.4 83.4,28.6 57.278,28.683 3.375,28.879 5.143,28.95 6.84,28.95 90.834,29.06 92.301,29.06 93.768,29.06 23.2,29.18 16.46,29.29 90.834,30.527 92.301,30.527 93.768,30.527 63.764,31.298 65.049,31.298 87.449,31.364 78.71,31.72 90.834,31.994 92.301,31.994 93.768,31.994 4.76,32.08 5.8,32.08 75.822,32.601 79.519,32.612 85.45,32.75 78.71,32.996 90.834,33.461 92.301,33.461 93.768,33.461 87.174,33.477 75.822,33.57 74.802,33.586 79.519,33.581 80.422,33.629 40.8,33.9 45.2,33.9 78.71,33.965 73.788,34.55 74.802,34.555 75.822,34.538 79.519,34.55 80.422,34.598 81.259,34.621 8.55,34.65 9.59,34.65 40.8,34.7 45.2,34.7 78.71,34.934 90.834,34.928 92.301,34.928 93.768,34.928 23.9,35.4 34.73,35.51 72.732,35.514 73.788,35.519 74.802,35.524 75.822,35.507 79.519,35.518 80.422,35.566 81.259,35.59 67.694,35.605 37.1,35.73 78.71,35.903 84.81,36.117 86.78,36.131 90.834,36.395 92.301,36.395 93.768,36.395 73.788,36.488 75.822,36.476 79.519,36.487 74.802,36.492 80.422,36.535 81.259,36.559 78.71,36.871 4.07,37.32 5.11,37.32 75.822,37.445 79.519,37.456 74.802,37.461 80.422,37.504 84.959,37.645 86.426,37.645 87.893,37.645 89.36,37.645 90.827,37.645 92.294,37.645 93.761,37.645 78.7,37.94 27.1,38 33.27,38.12 37.09,38.32 75.822,38.413 79.519,38.425 60.8,38.8 61.6,38.8 68.206,38.827 78.67,39.19 86.82,39.646 88.309,39.646 90.266,39.646 91.551,39.646 93.742,39.646 68.979,39.737 23.9,40.5 41.26,40.54 42.3,40.54 33.28,40.67 92.516,41.129 70.863,41.657 7.18,41.86 70.13,42.271 49,42.36 92.509,42.379 93.735,42.363 61.7,42.5 62.5,42.5 7.18,42.9 43.31,43.02 44.35,43.02 34.77,43.07 2.48,43.14 23.9,43.2 49,43.4 86.94,43.59 89.79,43.65 2.48,44.18 63.2,44.6 86.94,44.63 89.79,44.69 67.9,44.896 57.8,45.5 58.6,45.5 27.1,45.7 33.27,45.79 38.8,45.85 79.33,46.064 66.119,46.455 38.8,46.89 5.22,46.91 80.4,46.98 8.4,47.51 63.28,47.51 49.965,47.727 79.63,47.77 5.22,47.95 23.9,48.3 44.4,48.34 8.4,48.55 71.21,48.64 34.13,48.73 53.3,48.9 54.5,48.9 55.6,48.9 56.7,48.9 57.8,48.9 51.9,49 63.54,49.12 44.4,49.38 28.64,49.56 29.68,49.56 34.13,49.77 53.3,49.8 54.5,49.8 55.6,49.8 56.7,49.8 57.8,49.8 92.521,49.949 93.747,49.933 65.2,50.37 51.9,50.4 69.14,50.86 2.38,51.19 93.747,51.4 92.521,51.415 2.38,52.23 64.96,52.83 93.747,52.867 92.521,52.882 51.762,53.277 59.92,53.45 64.96,53.87 27.73,54.17 28.77,54.17 52.644,54.148 80.33,54.194 42.98,54.2 44.02,54.2 93.747,54.334 92.521,54.349 59.92,54.49 92.521,55.816 93.747,55.801 42.27,56.66 43.31,56.66 24.37,56.75 25.41,56.75 74.795,57.035 92.521,57.283 82.657,57.527 7.64,57.75 74.06,57.77 46.585,58.405 7.64,58.79 41.885,58.795 82.657,58.812 34.02,59.12 45.85,59.14 41.15,59.53 21.94,59.96 34.02,60.16 43.685,61.375 14.57,61.46 42.95,62.11 14.57,62.5 25.1,62.62 73.62,62.627 66.092,62.666 66.929,62.699 78.29,62.74 83.86,62.93 64.51,63.4 77.46,63.59 30.92,63.71 31.96,63.71 70.92,63.752 73.244,63.769 74.174,63.791 75.216,63.82 89.17,63.84 83.86,63.97 55.74,64.42 64.51,64.44 60.49,64.47 78.475,64.698 73.612,64.838 89.17,64.88 70.92,65.037 55.74,65.46 60.49,65.51 21.96,65.63 70.912,66.113 99.083,66.268 46.38,66.523 2.96,66.59 99.076,67.35 69.14,67.53 46.38,67.563 2.96,67.63 8.29,67.84 31.54,67.88 32.58,67.88 22.77,68.49 87.24,68.6 88.28,68.6 85.89,68.67 43.821,68.684 8.29,68.88 85.155,69.405 43.821,69.724 35.492,70.022 39.91,70.31 22.763,70.334 90.94,70.73 67.72,71.01 68.76,71.01 35.492,71.062 39.91,71.35 88,71.57 89.04,71.57 90.94,71.77 74.9,71.99 76.31,72 57.1,72.77 58.14,72.77 74.9,73.03 76.31,73.04 67.72,73.56 68.76,73.56 2.92,73.6 3.96,73.6 96.48,74.03 97.52,74.03 91.62,74.08 92.66,74.08 6.83,74.48 7.87,74.48 22.48,75.49 24.52,75.55 87.46,75.76 2.15,76.68 87.46,76.8 5.18,76.9 68.65,76.96 69.69,76.96 16.03,77.33 11.85,77.59 2.15,77.72 16.63,77.85 5.18,77.94 68.64,77.97 69.68,77.97 64.48,78.05 65.52,78.05 59.1,78.49 60.14,78.49 51.87,78.55 52.91,78.55 11.85,78.63 33.25,79.01 34.29,79.01 14.92,80.14 15.96,80.14 68.35,80.23 69.39,80.23 6.74,80.63 33.24,81.47 27.78,81.63 6.74,81.67 25.15,82.34 30.19,82.42 85.2,82.654 85.846,82.654 86.492,82.654 85.2,83.3 85.846,83.3 86.492,83.3 48.86,83.71 39.86,83.83 56.95,83.83 43.42,83.84 52.22,83.88 85.2,83.946 85.846,83.946 86.492,83.946 27.84,85.48 3.019,85.649 21.86,86.12 25.17,86.12 27.84,86.52 3.019,86.689 21.86,87.16 25.17,87.16 31.24,87.16 32.28,87.16 13.86,87.23 13.86,88.27 43.48,88.48 46.43,88.51 48.87,88.49 52.2,88.61 22.27,95.2 23.31,95.2 36.8,95.38 37.84,95.38 10.99,96.97 12.03,96.97 31.49,97.79 32.53,97.79
IO1V8_LDO: C11.2 C30.2 U1.57 U11.8 | length 52.9
  Top Layer w0.2: C11.2@74.472,28.675 U1.57@76.351,30.554
  Top Layer w0.4: U11.8@53.926,52.23 U11.8@53.926,53.744 ; C11.2@74.464,28.436 74.877,28.436 75.091,28.65 v1(75.118,28.65)
  Top Layer w0.5: v1(50.912,41.968) 50.906,41.974 50.906,51.518 51.618,52.23 C30.2@52.432,52.23 53.926,52.23 U11.8@53.926,52.214
  Bottom Layer w0.4: v1(50.912,41.968) 50.912,40.776 68.663,23.024 68.995,23.024 74.601,28.631 75.099,28.631 v1(75.118,28.65)
IO3V3_LDO: C13.2 R5.2 R16.2 R19.2 R22.2 R24.2 R29.2 R30.2 R34.2 R57.1 R58.2 U1.59 U3.5 | length 198.1
  Top Layer w0.2: C13.2@75.834,26.966 76.418,27.55 76.418,29.489 U1.59@76.917,29.988
  Top Layer w0.3: U3.5@3.216,70.309 3.216,71.529 4.178,72.491 v1(8.195,72.491) ; v1(14.79,72.49) 14.79,72.544 14.9,72.654 14.9,77.787 16.135,79.022 31.975,79.022 32.336,79.383 R57.1@32.336,82.224 34.157,82.224 v1(34.919,82.986) ; v1(28.425,68.283) R58.2@29.289,68.283 ; v1(28.43,71.1) 28.431,71.101 29.286,71.101 R34.2@29.287,71.103 ; R29.2@63.834,81.588 63.846,81.575 65.81,81.575 R16.2@65.823,81.563 65.828,81.557 65.828,81.034 v1(65.834,81.028) ; v1(68.97,81.03) 68.985,81.045 68.985,81.569 R22.2@69,81.584 69.012,81.571 71.365,81.571 R24.2@71.377,81.559 71.374,81.556 71.374,77.109 v1(71.372,77.106)
  Top Layer w0.5: C13.2@75.834,26.966 75.834,26.931 v1(76.206,26.558) 76.206,21.719 76.578,21.347 77.147,21.347 77.155,21.34 v1(82.221,21.34) ; R5.2@87.989,29.846 88.06,29.846 88.644,29.261 v1(88.651,29.261)
  Bottom Layer w0.3: v1(8.195,72.491) 14.79,72.491 14.79,69.5 14.966,69.324 23.27,69.324 24.311,68.283 v1(28.425,68.283) 28.428,68.285 28.428,71.098 v1(28.43,71.1) ; v1(34.919,82.986) 34.938,82.986 35.195,82.729 62.452,82.729 64.153,81.028 v1(65.834,81.028) ; v1(65.834,81.028) v1@68.969,81.029 ; v1(71.372,77.106) 73.069,75.409 78.144,75.409 79.337,74.217 79.337,56.258 71.99,48.911 71.99,47.892 77.085,42.797 77.085,26.734 76.91,26.558 v1(76.206,26.558)
  Bottom Layer w0.5: v1(82.221,21.34) 88.651,27.77 v1(88.651,29.261)
LEDA: LCD1.19 Q2.3 | length 56.6
  Top Layer w0.6: LCD1.19@19,52.733 45.425,52.733 v2(49.416,56.724) ; v2(50.14,69.75) 61.38,69.75 Q2.3@61.383,69.753
  Bottom Layer w0.6: v2(49.416,56.724) 50.14,57.447 v2(50.14,69.75)
MCU_VCC: C19.2 D2.2 R1.1 R38.1 U1.65 | length 9.6
  Top Layer w0.2: U1.65@79.25,30.836 80.274,29.813
  Top Layer w0.4: 80.203,29.742 80.203,29.126 82.3,27.03 C19.2@82.3,26.782
  Top Layer w0.5: C19.2@82.3,26.782 D2.2@83.2,25.882 ; D2.2@83.177,25.859 83.177,25.74 85.112,23.805 85.225,23.805 R1.1@85.25,23.78
MIC+: C20.2 C23.1 MIC1.1 R28.1 | length 4.7
  Top Layer w0.2: C23.1@69.935,10.313 69.944,10.303 70.858,10.303 71.792,10.303 72.124,9.971 MIC1.1@74.515,9.971
MIC-: C24.1 C25.2 MIC1.2 R33.2 | length 7.8
  Top Layer w0.2: C24.1@69.943,9.292 69.955,9.304 71.789,9.304 C25.2@71.801,9.317 71.976,9.492 72.151,9.492 72.201,9.542 73.316,9.542 73.462,9.396
  Top Layer w0.55: 73.911,8.925 ccw(c74.331,9.345) 74.331,8.751 74.687,8.751 ccw(c74.687,9.329) 75.096,8.92 ; 73.941,11.024 cw(c74.357,10.608) 74.357,11.197 74.58,11.197 cw(c74.58,10.257) 75.223,10.943 cw(c74.58,10.257) 75.245,10.922 MIC1.2@75.342,10.824 ; 75.565,10.544 cw(c75.11,10.089) 75.753,10.089 75.753,9.842 cw(c75.121,9.842) 75.568,9.395
MIC_BIAS: C14.2 R28.2 U1.60 | length 24.8
  Top Layer w0.2: R28.2@70.858,11.284 v1@70.858,12.078 ; v1(76.89,22.03) 76.89,24.764 C14.2@77.452,25.326 76.798,25.98 76.798,29.303 U1.60@77.2,29.705
  Bottom Layer w0.2: v1(70.857,12.079) 76.378,12.079 76.89,12.591 v1(76.89,22.03)
NetC1_1: C1.1 C2.2 C3.2 | length 2.2
  Top Layer w0.4: C1.1@88.14,38.632 C1.1@88.145,38.637 ; C2.2@90.33,38.637 C2.2@90.335,38.642
  Top Layer w0.45: C1.1@88.145,38.637 C2.2@90.33,38.637
NetC2_1: C2.1 C4.2 RF1.1 | length 3
  Top Layer w0.45: C2.1@91.285,38.642 91.295,38.652 RF1.1@94.325,38.652
NetC7_2: C7.2 L1.2 U1.75 | length 4
  Top Layer w0.2: U1.75@82.079,33.665 82.938,32.805 83.045,32.805
  Top Layer w0.35: 83.045,32.805 83.826,32.024 83.9,32.024 84.008,31.916 84.196,31.916 84.994,31.117 L1.2@85.041,31.117
NetC8_2: C8.2 U1.77 | length 3.7
  Top Layer w0.2: U1.77@82.644,34.23 83.173,33.702 84.986,33.702 85.414,34.13 C8.2@85.938,34.13
NetC9_2: C9.2 R5.1 U1.74 | length 7.2
  Top Layer w0.2: U1.74@81.796,33.382 85.07,30.108 86.01,30.108 C9.2@86.081,30.037
  Top Layer w0.4: C9.2@86.081,30.037 86.091,30.037 87.131,28.997 R5.1@87.141,28.997
NetC10_2: C10.2 U1.36 | length 3.3
  Top Layer w0.2: C10.2@70.284,38.634 70.363,38.634 70.917,38.08 72.007,38.08 U1.36@72.957,37.13
NetC12_2: C12.2 U1.14 | length 5.6
  Top Layer w0.2: U1.14@79.816,39.675 80.998,40.857 80.998,44.371 C12.2@80.713,44.656
NetC15_2: C15.2 U1.31 | length 3.2
  Top Layer w0.2: C15.2@72.034,40.654 72.261,40.654 U1.31@74.371,38.544
NetC16_2: C16.2 U1.69 | length 3
  Top Layer w0.2: U1.69@80.382,31.968 82.062,30.287 82.062,30.273 82.192,30.143 82.192,29.936 C16.2@82.062,29.806
NetC17_2: C17.2 U1.62 | length 4.5
  Top Layer w0.2: C17.2@78.102,25.966 78.102,27.6 78.868,28.365 78.868,29.522 U1.62@78.402,29.988
NetC18_2: C18.2 L2.1 U1.63 | length 5.7
  Top Layer w0.2: U1.63@78.685,30.271 79.288,29.667 79.288,28.22 79.024,27.956 C18.2@79.024,26.945
  Top Layer w0.4: C18.2@78.954,26.874 79.095,26.874 79.206,26.985 80.842,26.985 L2.1@80.912,27.056
NetC21_2: C21.2 R11.1 R12.2 | length 1.9
  Top Layer w0.2: R12.2@17.82,22.532 C21.2@17.82,23.457 R11.1@17.82,24.389
NetC22_2: C22.2 R12.1 R65.2 | length 1.9
  Top Layer w0.2: R65.2@18.77,20.674 C22.2@18.77,21.607 R12.1@18.77,22.532
NetC28_2: C28.2 R17.1 R18.2 | length 1.9
  Top Layer w0.2: R18.2@21.023,22.529 R17.1@21.023,24.381
NetC29_2: C29.2 R18.1 R66.2 | length 1.9
  Top Layer w0.2: R66.2@20.073,20.661 R18.1@20.073,22.529
NetC33_2: C33.2 R25.1 U3.1 | length 2.4
  Top Layer w0.3: R25.1@6.096,77.386 6.091,77.381 6.148,77.324 C33.2@7.04,77.324 7.033,77.317 7.033,75.916 U3.1@7.026,75.909
NetC34_2: C34.2 R27.1 TF1.4 | length 3.6
  Top Layer w0.5: TF1.4@67.03,85.081 67.04,85.071 67.04,82.6 67.04,81.506 R27.1@67.05,81.495
NetC43_2: C43.2 R40.1 | length 3.4
  Top Layer w0.2: R40.1@18.8,16.548 19.774,16.548 20.073,16.847 C43.2@20.073,18.8
NetC44_2: C44.2 R41.1 | length 1
  Top Layer w0.2: C44.2@18.77,18.808 18.77,17.893 R41.1@18.797,17.866
NetC47_1: C47.1 U7.2 | length 1.5
  Top Layer w0.2: U7.2@16.335,15.343 16.342,15.335 17.792,15.335 C47.1@17.8,15.328
NetC53_2: C53.2 R45.1 U8.4 | length 2.5
  Top Layer w0.2: U8.4@74.84,62.82 74.914,62.746 C53.2@76.379,62.746 76.385,62.74 76.385,61.826 R45.1@76.391,61.82
NetC54_1: C54.1 C59.2 U9.19 U10.2 | length 4.4
  Top Layer w0.22: C54.1@84.99,86.74 84.99,86.2 85.446,85.744 U9.19@85.446,84.8
  Top Layer w0.55: U10.2@82.959,86.254 83.141,86.436 83.747,86.436 C59.2@84.05,86.74 C54.1@84.99,86.74
NetC55_1: C55.1 R50.2 R51.2 R56.1 U9.18 | length 16.5
  Top Layer w0.22: U9.18@85.846,84.8 85.846,86.648 C55.1@85.937,86.74 ; v1(90.296,89.14) 90.446,89.29 95.203,89.29 95.452,89.041 95.452,89.031 R50.2@95.837,88.646 R56.1@95.837,86.807
  Bottom Layer w0.22: v1(85.837,86.224) 89.378,86.224 90.296,87.142 v1(90.296,89.14)
NetC56_1: C56.1 U9.1 | length 2.4
  Top Layer w0.2: C56.1@82.266,84.839 83.005,84.1 U9.1@84.346,84.1
NetC60_2: C60.2 U9.4 Y2.1 | length 5.6
  Top Layer w0.2: Y2.1@79.424,83.416 79.424,83.316 80.362,82.377 81.685,82.377 C60.2@82.224,82.916 82.232,82.908 84.338,82.908 U9.4@84.346,82.9
NetC61_2: C61.2 U9.5 Y2.3 | length 3.8
  Top Layer w0.2: Y2.3@81.024,81.416 81.024,81.516 81.424,81.916 C61.2@82.224,81.916 82.808,82.5 U9.5@84.346,82.5
NetD3_1: D3.1 R7.1 | length 1.1
  Top Layer w0.2: R7.1@60.534,8.716 61.401,8.716 D3.1@61.592,8.525
NetD4_1: D4.1 R8.1 | length 1.1
  Top Layer w0.2: R8.1@60.534,9.673 61.365,9.673 D4.1@61.582,9.89